# Altium PCB EEM_FMC_Carrier.PcbDoc (part 5 of 19)
Units mm, origin at the board's own origin, x right, y up, seen from the top; angles counter-clockwise.
Board outline 222.9 x 100 mm, 6 copper layers (TopLayer, MidLayer1, MidLayer2, SignalLayer1, Internal Plane 1, BottomLayer), stack 1.528 mm thick; 790 components, 743 nets, 3570 pads, 2277 vias.
Unrouted connection lines stored in the file: 3.
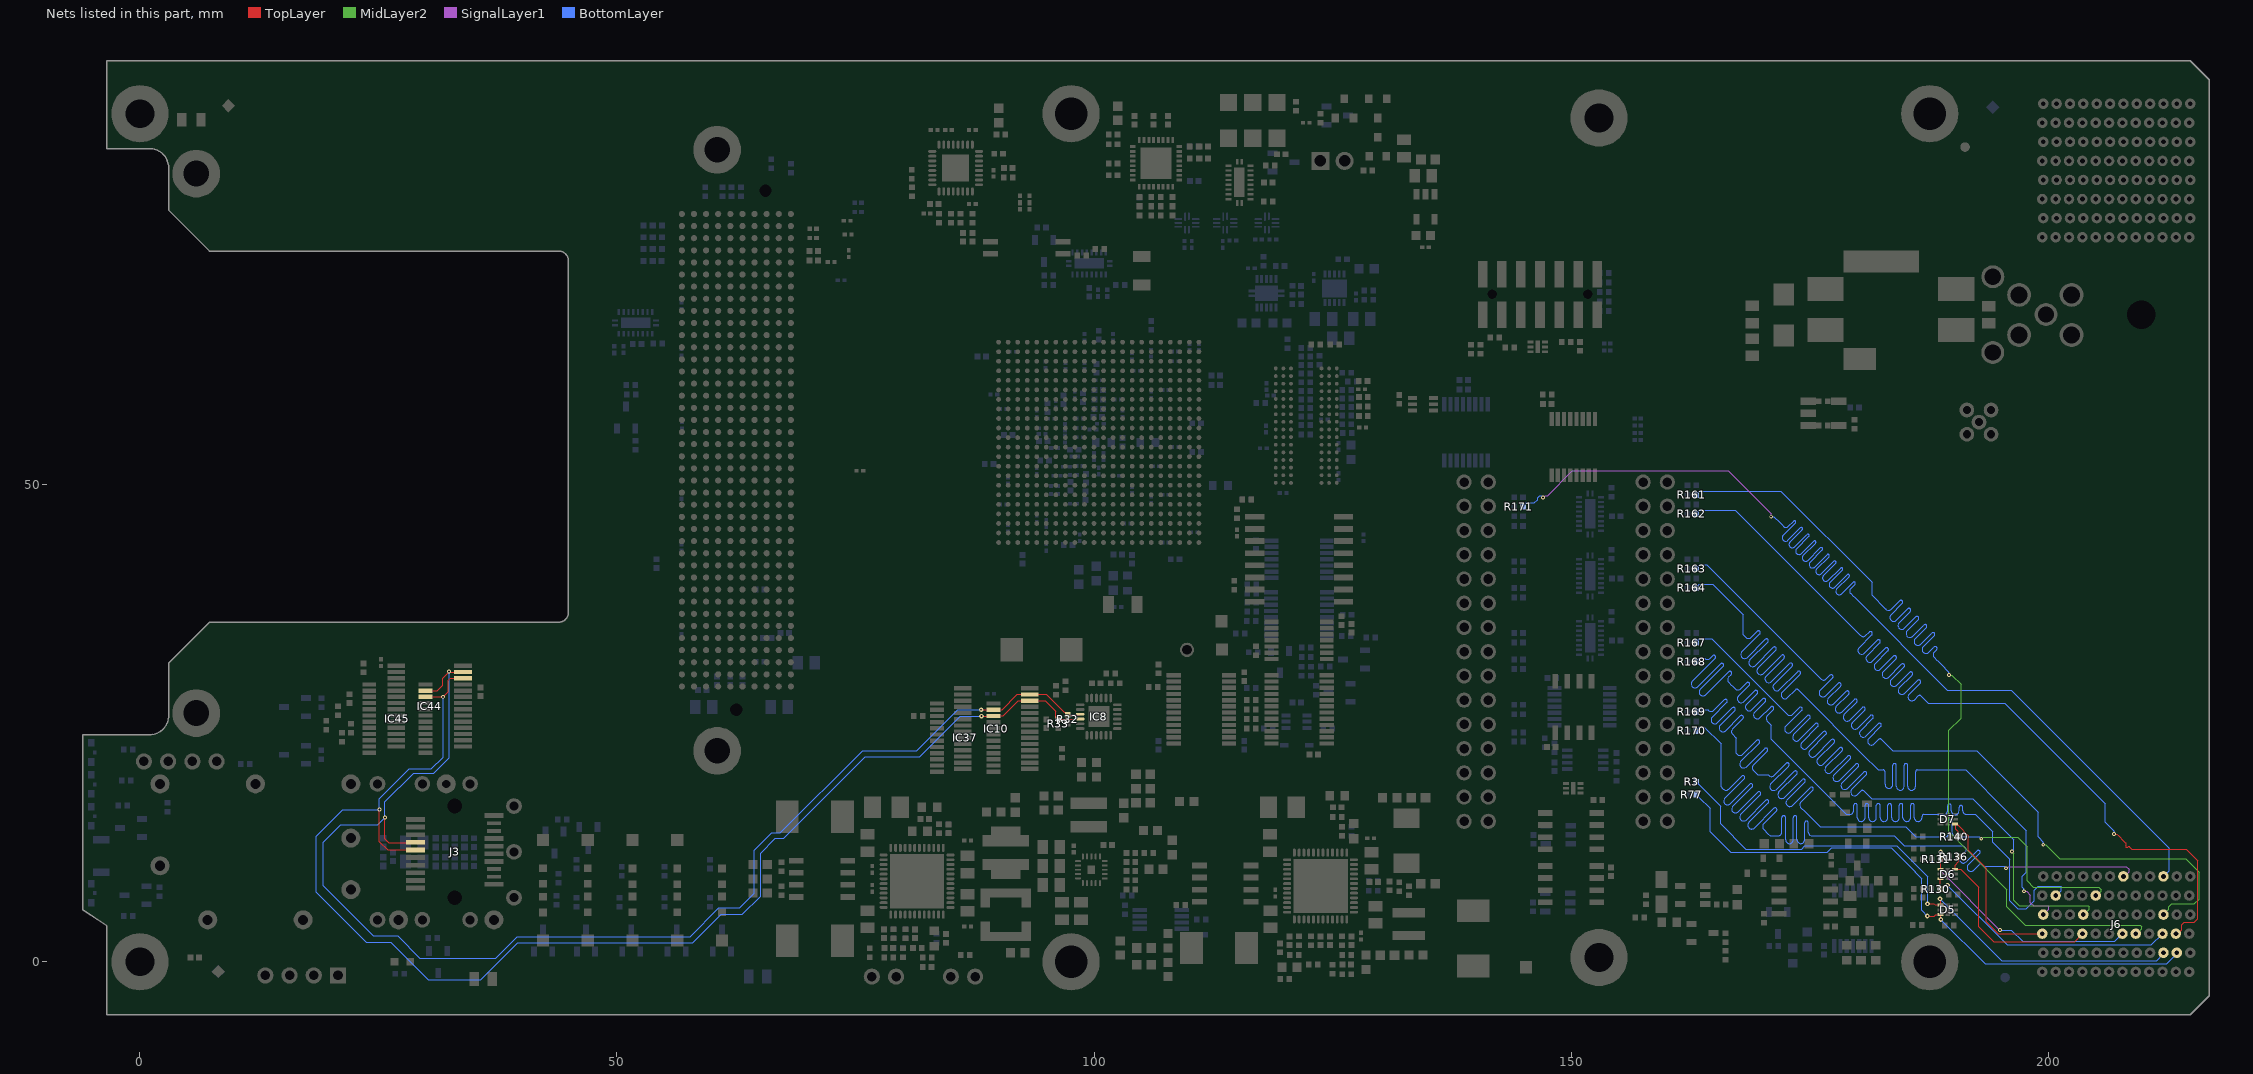
[diagram p8: the nets of this part, all layers, seen from the top]

## Part data (continued)
C231 C265: library part CTE3528-21_33UF_16V_10%, "Polarised capacitor", Case=B, Manufacturer=GENERIC, Manufacturer1 ComponentHeight=2.1mm, Manufacturer1 Example=AVX, Manufacturer1 Part Number=TAJB336K016R, Tolerance=±10%, Voltage=16V, Author="CERN DEM JLC", Component Type=Standard, CreateDate=03.12.2007, HelpURL=\\cern.ch\dfs\Applications\Altium\Datasheets\CTE_AVX_TAJ.pdf, LatestRevisionDate=03.12.2007, Manufacturer Part Number=CTE3528-21_33UF_16V_10%, Mounted=Yes, Part Description="Solid Tantalum Chip Capacitor", Part Number=CTE3528-21_33UF_16V_10%, Pin Count=2, Sense=No, SMD=Yes, Socket=No, Status=Preferred
C252 C256: library part CC0402_68PF_50V_5%_C0G, "Non-polarised capacitor", Case=0402, Manufacturer=GENERIC, Manufacturer1 ComponentHeight=0.55mm, Manufacturer1 Example=KEMET, Manufacturer1 Part Number=C0402C680J5GACTU, Tolerance=±5%, Voltage=50V, Author="CERN DEM JLC", Component Type=Standard, CreateDate=03.12.2007, HelpURL="\\cern.ch\dfs\Applications\Altium\Datasheets\CC0805_C0G_KEMET_(Commercial Grade).pdf", LatestRevisionDate=22.04.2015, Manufacturer Part Number=CC0402_68PF_50V_5%_C0G, Mounted=Yes, Part Description="SMD Multilayer Chip Ceramic Capacitor", Part Number=CC0402_68PF_50V_5%_C0G, Pin Count=2, Sense=No, SMD=Yes, Socket=No, Status=Preferred, TC=C0G/NP0
C254: library part CC0603_1.2NF_50V_10%_X7R, "Non-polarised capacitor", Case=0603, Manufacturer=GENERIC, Manufacturer1 ComponentHeight=0.87mm, Manufacturer1 Example=PHYCOMP, Manufacturer1 Part Number=223858615624, Tolerance=±10%, Voltage=50V, Author="CERN DEM JLC", Component Type=Standard, CreateDate=03.12.2007, HelpURL=\\cern.ch\dfs\Applications\Altium\Datasheets\CC0603_X7R_PHYCOMP.pdf, LatestRevisionDate=03.12.2007, Manufacturer Part Number=CC0603_1.2NF_50V_10%_X7R, Mounted=Yes, Part Description="SMD Multilayer Chip Ceramic Capacitor", Part Number=CC0603_1.2NF_50V_10%_X7R, Pin Count=2, Sense=No, SMD=Yes, Socket=No, Status=Preferred, TC=X7R
C261 C279: library part CC0402_82PF_25V_1%_C0G_KEMET_HiQ-CBR, "Non-polarised capacitor", Case=0402, Manufacturer=KEMET, Manufacturer Part Number=CBR04C820F3GAC, Tolerance=±1%, Voltage=25V, Author="CERN DEM MR", Component Type=Standard, ComponentHeight=0.55mm, CreateDate=2017-11-17, HelpURL=\\cern.ch\dfs\Applications\Altium\Datasheets\CC0402_C0G_KEMET_HiQ-CBR.pdf, LatestRevisionDate=2017-11-21, Mounted=Yes, Part Description="High Q and low ESR, SMD Multilayer Chip Ceramic Capacitor, HiQ-CBR Series", Part Number=CC0402_82PF_25V_1%_C0G_KEMET_HiQ-CBR, Pin Count=2, Sense=No, SMD=Yes, Socket=No, Status="Not Recommended", TC=C0G/NP0
C271 C281: library part CC0402_2.2NF_50V_10%_X7R, "Non-polarised capacitor", Case=0402, Manufacturer=GENERIC, Manufacturer1 ComponentHeight=0.55mm, Manufacturer1 Example=PHYCOMP, Manufacturer1 Part Number=223858715627, Tolerance=±10%, Voltage=50V, Author="CERN DEM JLC", Component Type=Standard, CreateDate=2007-12-03, HelpURL=\\cern.ch\dfs\Applications\Altium\Datasheets\CC0402_X7R_PHYCOMP.pdf, LatestRevisionDate=2007-12-03, Manufacturer Part Number=CC0402_2.2NF_50V_10%_X7R, Mounted=Yes, Part Description="SMD Multilayer Chip Ceramic Capacitor", Part Number=CC0402_2.2NF_50V_10%_X7R, Pin Count=2, Sense=No, SMD=Yes, Socket=No, Status="Not Recommended", TC=X7R
C277: library part CC0402_3.9NF_50V_5%_X7R, "Non-polarised capacitor", Case=0402, Manufacturer=GENERIC, Manufacturer1 ComponentHeight=0.55mm, Manufacturer1 Example="YAGEO PHYCOMP", Manufacturer1 Part Number=CC0402JRX7R9BB392, Tolerance=±5%, Voltage=50V, Author="CERN DEM BC", Component Type=Standard, CreateDate=2020-07-14, HelpURL=\\cern.ch\dfs\Applications\Altium\Datasheets\CC0402_X7R_YAGEO_6.3VTO50V.pdf, LatestRevisionDate=2020-07-14, Manufacturer Part Number=CC0402_3.9NF_50V_5%_X7R, Mounted=Yes, Part Description="SMD Multilayer Chip Ceramic Capacitor", Part Number=CC0402_3.9NF_50V_5%_X7R, Pin Count=2, Sense=No, SMD=Yes, Socket=No, Status=Preferred, TC=X7R
C283: library part CC0402_100PF_50V_5%_C0G, "Non-polarised capacitor", Case=0402, Manufacturer=GENERIC, Manufacturer1 ComponentHeight=0.55mm, Manufacturer1 Example=KEMET, Manufacturer1 Part Number=C0402C101J5GACTU, Tolerance=±5%, Voltage=50V, Author="CERN DEM JLC", Component Type=Standard, CreateDate=2007-12-03, HelpURL="\\cern.ch\dfs\Applications\Altium\Datasheets\CC0402_C0G_KEMET_(Commercial Grade).pdf", LatestRevisionDate=2015-04-22, Manufacturer Part Number=CC0402_100PF_50V_5%_C0G, Mounted=Yes, Part Description="SMD Multilayer Chip Ceramic Capacitor", Part Number=CC0402_100PF_50V_5%_C0G, Pin Count=2, Sense=No, SMD=Yes, Socket=No, Status=Preferred, TC=C0G/NP0
Cage1: library part TYCO_2007198-1, "SFP+ 1x1 Cage (20Pins)", Manufacturer="TYCO ELECTRONICS", Manufacturer Part Number=2007198-1, Author="CERN DEM JLC", Component Type=Standard, ComponentHeight=9.7mm, CreateDate=04-Jun-13, Family=SFP+, HelpURL=\\cern.ch\dfs\Applications\Altium\Datasheets\TYCO_2007198-1.pdf, LatestRevisionDate=12-Jun-13, Mounted=Yes, Part Description="1x1 Press Fit Cage For Use with SFP+ Connector (Small Form-factor Pluggable)", Part Number=TYCO_2007198-1, Pin Count=20, PressFit=Yes, Sense=No, SMD=No, Socket=No, Status=None
D1 D2: library part CMP-004-00040-1, "Rectifier Diode Small Signal Switching 70V 0.215A 3000ns 3-Pin SOT-23 T/R", Case/Package=SOT-23-3, Forward Current=715mA, Forward Voltage=1.25V, Max Operating Temperature=150°C, Max Surge Current=2A, Min Operating Temperature=-65°C, Pins=3
D3 D5 D6 D7 D8: library part CMP-004-00037-2, "Diode TVS Quint Common Anode Uni-Dir 3.3V 40W 6-Pin SLP EP T/R", Max Operating Temperature=125°C, Min Operating Temperature=-55°C, Mounting Technology="Surface Mount", Pins=6
D4: "Schottky Diode", Case=SOD323, Manufacturer=INFINEON, Power=750mA, Voltage=40V, Author="CERN DEM JLC", Bonding=No, Component Type=Standard, ComponentHeight=1.1mm, CreateDate=12.11.2014, Device=BAT165, HelpURL=\\cern.ch\dfs\Applications\Altium\Datasheets\BAT165.pdf, LatestRevisionDate=12.11.2014, Manufacturer Part Number=BAT165, Mounted=Yes, PackageDescription="Small Outline Diode (SOD-323), 1.70mm W X 1.25mm L X 1.10mm H body,  IPC Medium Density", Part Description="Medium Power AF Schottky Diode", Part Number=BAT165, Pin Count=2, PressFit=No, Sense=No, SMD=Yes, Socket=No
D10: "Zener Diode", Case=DO-214AA, Manufacturer="FAIRCHILD SEMICONDUCTOR", Power=600W, Voltage=12V, Author="CERN DEM JLC", Bonding=No, Component Type=Standard, ComponentHeight=2.65mm, CreateDate=10.04.2013, Device=SMBJ12A, HelpURL=\\cern.ch\dfs\Applications\Altium\Datasheets\SMBJ.pdf, LatestRevisionDate=10.04.2013, Manufacturer Part Number=SMBJ12A, Mounted=Yes, PackageDescription="DO-214-AA/SMB Diode, Molded Body; 5.34mm L X 3.625mm W X 2.65mm H, IPC Medium Density", Part Description="Uni-Directional Transient Voltage Suppressor Diode", Part Number=SMBJ12A, Pin Count=2, PressFit=No, Sense=No, SMD=Yes, Socket=No
D12 D13: "Schottky Diode", Case=SOD-523F, Manufacturer=COMCHIP, Power=500mA, Voltage=20V, Author="CERN DEM HF", Bonding=No, Component Type=Standard, ComponentHeight=1mm, CreateDate=13.10.2023, Device=CDBU0520-HF, HelpURL=\\cern.ch\dfs\Applications\Altium\Datasheets\CDBU0520-HF.pdf, LatestRevisionDate=13.10.2023, Manufacturer Part Number=CDBU0520-HF, Mounted=Yes, PackageDescription="Small Outline Diode Flat Lead (SOD-523F), Body; 1.80mm L X 1mm W X 0.85mm H", Part Description="20V Surface mount Schottky Barrier Diode", Part Number=CDBU0520-HF, Pin Count=2, PressFit=No, Sense=No, SMD=Yes, Socket=No
FL1: library part FIL_MURATA_BNX022-01L, "Block Type EMIFIL (LC Combined)", Manufacturer=MURATA, Manufacturer Part Number=BNX022-01L, Resistance=0.5R, Author="CERN DEM JLC", Component Type=Standard, ComponentHeight=3.3mm, CreateDate=10.10.2012, HelpURL=\\cern.ch\dfs\Applications\Altium\Datasheets\FIL_MURATA_BNX022-01L.pdf, LatestRevisionDate=10.10.2012, Mounted=Yes, Part Description="Block Type EMIFIL (LC Combined) SMD Type, BNX02* Series", Part Number=FIL_MURATA_BNX022-01L, Pin Count=2, Sense=No, SMD=Yes, Socket=No, Status=None
FTG1 FTG6: library part FIDUCIAL_TARGET_C100-200, "Fiducial Target", Author="CERN DEM JLC", Component Type="Standard (No BOM)", ComponentHeight=0mm, CreateDate=09.02.2010, Family=Fiducial, HelpURL=Undefined, LatestRevisionDate=04.04.2012, Mounted=No, PackageDescription="Round Fiducial Target, Top Layer, 1.0mm, Top Solder 2.0mm, Keepout =2.0mm", Part Description="Round Fiducial Target, Top Layer, 1.0mm, Top Solder 2.0mm, Keepout =2.0mm", Part Number=FIDUCIAL_TARGET_C100-200, Pin Count=1, Sense=No, SMD=Yes, Socket=No, Status=None
FTG2 FTG3 FTG4 FTG5: library part FIDUCIAL_TARGET_S100-200, "Fiducial Target", Author="CERN DEM JLC", Component Type="Standard (No BOM)", ComponentHeight=0mm, CreateDate=09.02.2010, Family=Fiducial, HelpURL=Undefined, LatestRevisionDate=04.04.2012, Mounted=No, PackageDescription="Square Fiducial Target, Top Layer, 1.0mm, Top Solder 2.0mm, Keepout =2.0mm", Part Description="Square Fiducial Target, Top Layer, 1.0mm, Top Solder 2.0mm, Keepout =2.0mm", Part Number=FIDUCIAL_TARGET_S100-200, Pin Count=1, Sense=No, SMD=Yes, Socket=No, Status=None
HS1: "Heat Sink Without Pad", Manufacturer="Radian Thermal Products, Inc.", Manufacturer Part Number=FI23+BU+T725, ComponentHeight="16 mm", HelpURL=https://www.radianheatsinks.com/product/fi23/, Part Description="23 x 23 x 16 mm, clip on heatsink with fan for IC design BGA and others"
IC1: "Two Selectable Inputs, 8 LVPECL Outputs, SiGe Clock Fanout Buffer", Case=QFN32, Manufacturer="ANALOG DEVICES", Author="CERN DEM MR", Bonding=No, Component Type=Standard, ComponentHeight=0.8mm, CreateDate=2016-11-30, Device=ADCLK948BCPZ, HelpURL=\\cern.ch\dfs\Applications\Altium\Datasheets\ADCLK948BCPZ.pdf, LatestRevisionDate=2016-11-30, Manufacturer Part Number=ADCLK948BCPZ, Mounted=Yes, PackageDescription="QFN, 0.50mm Pitch, Square; 32 Pin, 5.00mm L X 5.00mm W X 0.80mm H body (w/Thermal Tab 2.85 X 2.85mm), IPC Medium Density", Part Description="Two Selectable Inputs, 8 LVPECL Outputs, SiGe Clock Fanout Buffer", Part Number=ADCLK948BCPZ, Pin Count=33, PressFit=No, Sense=No, SMD=Yes, Socket=No
IC2: "ULTRA PRECISION DIFFERENTIAL LVPECL 4:1 MUX with 1:2 FANOUT and INTERNAL TERMINATION", Manufacturer=Microchip, Device=SY58029U, Manufacturer Part Number=SY58029U
IC3 IC27 IC28 IC29 IC36 IC41: "Two-Channel Differential 2:1/1:2 USB3.1 Mux/Demux", Case=TQFN20, Manufacturer="TEXAS INSTRUMENTS", Author="CERN DEM BC", Bonding=No, Component Type=Standard, ComponentHeight=1mm, CreateDate=2019-11-06, Device=HD3SS3212RKS, HelpURL=\\cern.ch\dfs\Applications\Altium\Datasheets\HD3SS3212RKS.pdf, LatestRevisionDate=2019-11-06, Manufacturer Part Number=HD3SS3212RKS, Mounted=Yes, PackageDescription="QFN, TEXAS Case Style RKS, 0.50mm Pitch, Rect.; 20 Pin, 2.50mm L X 4.50mm W X 1.00mm H body (w/Thermal Tab 1.1mm X 3.1mm)", Part Description="Two-Channel Differential 2:1/1:2 USB3.1 Mux/Demux", Part Number=HD3SS3212RKS, Pin Count=21, PressFit=No, Sense=No, SMD=Yes, Socket=No
IC4: "Artix-7 FPGA, 285 User I/Os, 4 GTP, 484-Ball BGA, Pb-Free", Device=XC7A200T-3FBG484E, Manufacturer Part Number=XC7A200T-3FBG484E
IC5 IC6 IC7: "Dual-Bit Dual-Supply Bus Transceiver With Configurable Voltage Translation and 3-State Outputs", Case=QFN10, Manufacturer="TEXAS INSTRUMENTS", Author="CERN DEM JLC", Bonding=No, Component Type=Standard, ComponentHeight=0.55mm, CreateDate=07.07.2014, Device=SN74AVC2T245RSWR, HelpURL=\\cern.ch\dfs\Applications\Altium\Datasheets\SN74AVC2T245RSWR.pdf, LatestRevisionDate=30.03.2017, Manufacturer Part Number=SN74AVC2T245RSWR, Mounted=Yes, PackageDescription="QFN, 0.40mm Pitch, Rect.;10 Pin, 1.80mm L X 1.40mm W X 0.55mm H Body, IPC Medium Density", Part Description="Dual-Bit Dual-Supply Bus Transceiver With Configurable Voltage Translation and 3-State Outputs", Part Number=SN74AVC2T245RSWR, Pin Count=10, PressFit=No, Sense=No, SMD=Yes, Socket=No, Status="Not Recommended"
IC8: "Low Voltage 8-Channel I2C Switch With Reset", Case=QFN24, Manufacturer="TEXAS INSTRUMENTS", Author="CERN DEM JLC", Bonding=No, Component Type=Standard, ComponentHeight=1mm, CreateDate=2014-07-07, Device=TCA9548ARGER, HelpURL=\\cern.ch\dfs\Applications\Altium\Datasheets\TCA9548ARGER.pdf, LatestRevisionDate=2014-07-07, Manufacturer Part Number=TCA9548ARGER, Mounted=Yes, PackageDescription="QFN, 0.50mm Pitch, Square; 24 Pin, 4.00mm L X 4.00mm W X 1.00mm H body (w/Thermal Tab 2.20 X 2.20mm), IPC Medium Density", Part Description="Low Voltage 8-Channel I2C Switch With Reset", Part Number=TCA9548ARGER, Pin Count=25, PressFit=No, Sense=No, SMD=Yes, Socket=No
IC9 IC15 IC17: "8-Bit Dual-Supply Bus Transceiver With Configurable Voltage Translation and 3-State Outputs", Case=TSSOP24, Manufacturer="TEXAS INSTRUMENTS", Author="CERN DEM JLC", Bonding=No, Component Type=Standard, ComponentHeight=1.2mm, CreateDate=02.09.2009, Device=SN74LVC8T245PW, HelpURL=\\cern.ch\dfs\Applications\Altium\Datasheets\SN74LVC8T245PW.pdf, LatestRevisionDate=02.09.2009, Manufacturer Part Number=SN74LVC8T245PW, Mounted=Yes, PackageDescription="SOP, 0.65mm Pitch; 24 Pin, 4.40mm W X 7.80mm L X 1.20mm H Body, IPC Medium Density", Part Description="8-Bit Dual-Supply Bus Transceiver With Configurable Voltage Translation and 3-State Outputs", Part Number=SN74LVC8T245PW, Pin Count=24, PressFit=No, Sense=No, SMD=Yes, Socket=No
IC10 IC44: "16-bit I/O Port Expander With Serial Interface", Case=SSOP28, Manufacturer="MICROCHIP TECHNOLOGY", Author="CERN DEM JLC", Bonding=No, Component Type=Standard, ComponentHeight=2mm, CreateDate=17.01.2011, Device=MCP23017-E/SS, HelpURL=\\cern.ch\dfs\Applications\Altium\Datasheets\MCP23017-E-SS.pdf, LatestRevisionDate=17.01.2011, Manufacturer Part Number=MCP23017-E/SS, Mounted=Yes, PackageDescription="SOP, 0.65mm Pitch; 28 Pin, 5.30mm W X 10.20mm L X 2.00mm H Body, IPC Medium Density", Part Description="16-bit I/O Port Expander With Serial Interface", Part Number=MCP23017-E/SS, Pin Count=28, PressFit=No, Sense=No, SMD=Yes, Socket=No
IC11: "32 Meg x 16 x 8 Banks DDR3L SDRAM", Case=BGA96, Manufacturer="MICRON TECHNOLOGY", Author="CERN DEM MR", Bonding=No, Component Type=Standard, ComponentHeight=1.2mm, CreateDate=2015-12-14, Device=MT41K256M16TW-107:P, HelpURL=\\cern.ch\dfs\Applications\Altium\Datasheets\MT41K256M16TW-107-P.pdf, LatestRevisionDate=2015-12-14, Manufacturer Part Number=MT41K256M16TW-107:P, Mounted=Yes, PackageDescription="BGA 0.8mm, Pitch, Square 96 Pin, 9 Columns x 16 Rows, Body 14mm X 8mm X 1.2mm H", Part Description="+1.5V, 4Gb (32Meg x 16 x 8 banks) DDR3L SDRAM", Part Number=MT41K256M16TW-107:P, Pin Count=96, PressFit=No, Sense=No, SMD=Yes, Socket=No
IC12: "Sink/Source DDR Termination Regulator", Case=SON10, Manufacturer="TEXAS INSTRUMENTS", Author="CERN DEM JLC", Bonding=No, Component Type=Standard, ComponentHeight=1mm, CreateDate=03.02.2010, Device=TPS51200DRCT, HelpURL=\\cern.ch\dfs\Applications\Altium\Datasheets\TPS51200DRCT.pdf, LatestRevisionDate=06.11.2013, Manufacturer Part Number=TPS51200DRCT, Mounted=Yes, PackageDescription="SON, 0.50mm Pitch, 10-pin, 3.00mm W  X 3.00mm L X 1.00mm Height, (w/thermal tab 1.75 X 2.50 mm)", Part Description="3.3V Sink/Source DDR Termination Regulator", Part Number=TPS51200DRCT, Pin Count=11, PressFit=No, Sense=No, SMD=Yes, Socket=No
IC13: "Integrated Circuit", Manufacturer_Name=onsemi, Mouser Part Number=863-NCP51200MNTXG, Arrow Part Number=NCP51200MNTXG, Arrow Price/Stock=https://www.arrow.com/en/products/ncp51200mntxg/on-semiconductor?region=nac, Datasheet Link=http://www.onsemi.com/pub/Collateral/NCP51200-D.PDF, Height=1mm, Manufacturer Part Number=NCP51200MNTXG, Mouser Price/Stock=https://www.mouser.co.uk/ProductDetail/onsemi/NCP51200MNTXG?qs=mt7EBqA2jzgnxcGILBvARw%3D%3D
IC14: "500mA Peak Output LDO Regulator", Case=SOT23-5, Manufacturer="MICROCHIP TECHNOLOGY", Author="CERN DEM WB", Bonding=No, Component Type=Standard, ComponentHeight=1.45mm, CreateDate=2019-04-16, Device=MIC5219-3.3YM5, HelpURL=\\cern.ch\dfs\Applications\Altium\Datasheets\MIC5219-3.3YM5.pdf, LatestRevisionDate=2019-04-16, Manufacturer Part Number=MIC5219-3.3YM5, Mounted=Yes, PackageDescription="SOT, 0.95mm pitch; 5 pin, 1.60mm W X 2.90mm L X 1.45mm H body, IPC Medium Density", Part Description="3.3V 500mA Peak Output Low Drop-Out  (LDO) Regulator", Part Number=MIC5219-3.3YM5, Pin Count=5, PressFit=No, Sense=No, SMD=Yes, Socket=No
IC16: "4-BIT 1-OF-2 FET Multiplexer/Demultiplexer 2.5V/3.3V Low-Voltage Bus Switch 5V Tolerant Shifter", Case=TSSOP16, Manufacturer="TEXAS INSTRUMENTS", Author="CERN DEM JLC", Bonding=No, Component Type=Standard, ComponentHeight=1.2mm, CreateDate=2012-01-30, Device=SN74CB3T3257PW, HelpURL=\\cern.ch\dfs\Applications\Altium\Datasheets\SN74CB3T3257PW.pdf, LatestRevisionDate=2012-01-30, Manufacturer Part Number=SN74CB3T3257PW, Mounted=Yes, PackageDescription="SOP, 0.65mm Pitch; 16 Pin, 4.40mm W X 5.00mm L X 1.20mm H body, IPC Medium Density", Part Description="4-Bit 1-of-2 FET Multiplexer/Demultiplexer 2.5V/3.3V Low-Voltage Bus Switch 5V Tolerant Shifter", Part Number=SN74CB3T3257PW, Pin Count=16, PressFit=No, Sense=No, SMD=Yes, Socket=No
IC18 IC19: "TinyLogic® UHS 2-Input Non-Inverting Multiplexer", Case=SOT363, Manufacturer="FAIRCHILD SEMICONDUCTOR", Author="CERN DEM JLC", Bonding=No, Component Type=Standard, ComponentHeight=1.1mm, CreateDate=22.03.2012, Device=NC7SZ157P6X, HelpURL=\\cern.ch\dfs\Applications\Altium\Datasheets\NC7SZ157P6X.pdf, LatestRevisionDate=22.03.2012, Manufacturer Part Number=NC7SZ157P6X, Mounted=Yes, PackageDescription="SOT363, 0.65mm pitch; 6 pin, 1.40mm W X 2.15mm L, IPC Medium Density", Part Description="TinyLogic® UHS 2-Input Non-Inverting Multiplexer", Part Number=NC7SZ157P6X, Pin Count=6, PressFit=No, Sense=No, SMD=Yes, Socket=No
IC20 IC21 IC38 IC40: library part CMP-016-00739-2, "12-V, 1: 1 (SPST), (SPST), 4-channel analog switch 14-TSSOP -55 to 125", Case/Package=TSSOP, Max Operating Temperature=125°C, Max Supply Voltage=10V, Min Operating Temperature=-55°C, Min Supply Voltage=2V, Mounting Technology="Surface Mount", Pins=14
IC22: "128Mbit, MirrorBit® Flash Non-Volatile Memory CMOS 3.0 Volt Core with Versatile I/O Serial Peripheral Interface with Multi-I/O", Case=SOIC16, Manufacturer=SPANSION, Author="CERN DEM JLC", Bonding=No, Component Type=Standard, ComponentHeight=2.65mm, CreateDate=2014-07-10, Device=S25FL128SAGMFIR01, HelpURL=\\cern.ch\dfs\Applications\Altium\Datasheets\S25FL128SAGMFIR01.pdf, LatestRevisionDate=2014-07-10, Manufacturer Part Number=S25FL128SAGMFIR01, Mounted=Yes, PackageDescription="SOIC 16, Pitch 1.27mm - Body 7.5x10.3mm, IPC Medium Density", Part Description="128Mbit, 133MHz, MirrorBit® Flash Non-Volatile Memory CMOS 3V Core with Versatile I/O Serial Peripheral Interface with Multi-I/O", Part Number=S25FL128SAGMFIR01, Pin Count=11, PressFit=No, Sense=No, SMD=Yes, Socket=No
IC23: "Dual Bidirectional I2C Bus And SMBus Voltage-Level Translator", Case=SSOP8, Manufacturer="TEXAS INSTRUMENTS", Author="CERN DEM JLC", Bonding=No, Component Type=Standard, ComponentHeight=1.3mm, CreateDate=25.02.2013, Device=PCA9306DCTR, HelpURL=\\cern.ch\dfs\Applications\Altium\Datasheets\PCA9306DCTR.pdf, LatestRevisionDate=11.02.2016, Manufacturer Part Number=PCA9306DCTR, Mounted=Yes, PackageDescription="SOP, 0.65mm, Pitch; 8 Pin, 2.80mm W X 2.95mm L X 1.30mm H Body, PC Medium Density", Part Description="Dual Bidirectional I2C Bus And SMBus Voltage-Level Translator", Part Number=PCA9306DCTR, Pin Count=8, PressFit=No, Sense=No, SMD=Yes, Socket=No
IC24: library part CMP-031-05512-1, "Integrated Circuit", Manufacturer Name=NXP, Mouser Part Number=771-SC18IS606PWJ, Arrow Part Number=SC18IS606PWJ, Arrow Price/Stock=https://www.arrow.com/en/products/sc18is606pwj/nxp-semiconductors?region=nac, Datasheet Link=https://www.nxp.com/docs/en/data-sheet/SC18IS606.pdf, Design Item ID=SC18IS606PWJ, Height=1.1mm, Manufacturer Part Number=SC18IS606PWJ, Mouser Price/Stock=https://www.mouser.co.uk/ProductDetail/NXP-Semiconductors/SC18IS606PWJ?qs=pBJMDPsKWf02qtdqbj2bbA%3D%3D, Source=SamacSys.SchLib
IC25 IC26: "1.7V-5.5V, 2K I2C™ Serial EEPROMs with EUI-48™ Node Identity", Case=SOIC8, Manufacturer="MICROCHIP TECHNOLOGY", Author="CERN DEM MR", Bonding=No, Component Type=Standard, ComponentHeight=1.75mm, CreateDate=19.07.2016, Device=24AA025E48-I/SN, HelpURL=\\cern.ch\dfs\Applications\Altium\Datasheets\24AA025E48-I-SN.pdf, LatestRevisionDate=19.07.2016, Manufacturer Part Number=24AA025E48-I/SN, Mounted=Yes, PackageDescription="SOIC 8, Pitch 1.27mm - Body 4x5mm, IPC Medium Density", Part Description="1.7V-5.5V, 2K I2C™ Serial EEPROMs with EUI-48™ Node Identity", Part Number=24AA025E48-I/SN, Pin Count=8, PressFit=No, Sense=No, SMD=Yes, Socket=No
IC30: "Quad LVDS Line Receivers with Integrated Termination and Flow-Through Pinout", Case=TSSOP16, Manufacturer=MAXIM, Author="CERN DEM MR", Bonding=No, Component Type=Standard, ComponentHeight=1.1mm, CreateDate=2015-12-14, Device=MAX9122EUE+, HelpURL=\\cern.ch\dfs\Applications\Altium\Datasheets\MAX9122EUE+.pdf, LatestRevisionDate=2015-12-14, Manufacturer Part Number=MAX9122EUE+, Mounted=Yes, PackageDescription="SOP, 0.65mm Pitch; 16 Pin, 4.40mm W X 5.00mm L X 1.10mm H body, IPC Medium Density", Part Description="Quad LVDS Line Receivers with Integrated Termination and Flow-Through Pinout", Part Number=MAX9122EUE+, Pin Count=16, PressFit=No, Sense=No, SMD=Yes, Socket=No
IC31: "Single, 3V, CMOS, LVDS, High Speed Differential Driver", Case=SOIC8, Manufacturer="ANALOG DEVICES", Author="CERN DEM JMW", Bonding=No, Component Type=Standard, ComponentHeight=1.75mm, CreateDate=2014-02-26, Device=ADN4661BRZ, HelpURL=\\cern.ch\dfs\Applications\Altium\Datasheets\ADN4661BRZ.pdf, LatestRevisionDate=2014-02-26, Manufacturer Part Number=ADN4661BRZ, Mounted=Yes, PackageDescription="SOIC 8, Pitch 1.27mm - Body 4x5mm, IPC Medium Density", Part Description="Single, 3V, CMOS, LVDS, High Speed Differential Driver", Part Number=ADN4661BRZ, Pin Count=8, PressFit=No, Sense=No, SMD=Yes, Socket=No
IC32 IC34: "5-Channel Integrated Power Solution with Quad buck Regulators and 200mA LDO Regulator", Case=QFN48, Manufacturer="ANALOG DEVICES", Author="CERN DEM BC", Bonding=No, Component Type=Standard, ComponentHeight=0.8mm, CreateDate=2015-07-30, Device=ADP5052ACPZ, HelpURL=\\cern.ch\dfs\Applications\Altium\Datasheets\ADP5052ACPZ.pdf, LatestRevisionDate=2015-07-30, Manufacturer Part Number=ADP5052ACPZ, Mounted=Yes, PackageDescription="QFN, 0.50mm pitch,square; 12 pin X 12 pin, 7mm X 7mm X 0.8mm H body (w/thermal tab 5.70 X 5.70mm),  IPC Medium Density", Part Description="5-Channel Integrated Power Solution with Quad buck Regulators and 200mA LDO Regulator", Part Number=ADP5052ACPZ, Pin Count=49, PressFit=No, Sense=No, SMD=Yes, Socket=No
IC33: "Digital Temperature Sensor and Thermal Watchdog with Two-Wire Interface", Case=SSOP8, Manufacturer="TEXAS INSTRUMENTS", Author="CERN DEM JLC", Bonding=No, Component Type=Standard, ComponentHeight=1.09mm, CreateDate=15.10.2012, Device=LM75AIMM/NOPB, HelpURL=\\cern.ch\dfs\Applications\Altium\Datasheets\LM75AIMM-NOPB.pdf, LatestRevisionDate=15.10.2012, Manufacturer Part Number=LM75AIMM/NOPB, Mounted=Yes, PackageDescription="SOP, 0.65mm pitch; 8 pin,3.00mm W X 3.00mm L X 1.09mm H bodyI, PC Medium Density", Part Description="-25° to +100°C ±2°C Digital Temperature Sensor and Thermal Watchdog with Two-Wire Interface", Part Number=LM75AIMM/NOPB, Pin Count=8, PressFit=No, Sense=No, SMD=Yes, Socket=No
IC35: "500mA-Peak Output LDO Regulator 5.0V", Manufacturer=Microchip, Device=MIC5219-5.0YM5, Manufacturer Part Number=MIC5219-5.0YM5
IC37 IC45: "Low-Voltage 16-Bit I2C-Bus I/O Port with Interrupt and Reset", Case=TSSOP24, Manufacturer="NXP SEMICONDUCTORS", Author="CERN DEM JMW", Bonding=No, Component Type=Standard, ComponentHeight=1.1mm, CreateDate=2020-08-06, Device=PCA9539APW, HelpURL=\\cern.ch\dfs\Applications\Altium\Datasheets\PCA9539APW.pdf, LatestRevisionDate=2020-08-06, Manufacturer Part Number=PCA9539APW, Mounted=Yes, PackageDescription="SOP, 0.65mm Pitch; 24 Pin, 4.40mm W X 7.80mm L X 1.10mm H body, IPC Medium Density", Part Description="Low-Voltage 16-Bit I2C-Bus I/O Port with Interrupt and Reset", Part Number=PCA9539APW, Pin Count=24, PressFit=No, Sense=No, SMD=Yes, Socket=No
IC39: "LinCMOS Timer", Case=SOIC8, Manufacturer="TEXAS INSTRUMENTS", Author="CERN DEM JMW", Bonding=No, Component Type=Standard, ComponentHeight=1.75mm, CreateDate=23.08.2016, Device=TLC555ID, HelpURL=\\cern.ch\dfs\Applications\Altium\Datasheets\TLC555ID.pdf, LatestRevisionDate=23.08.2016, Manufacturer Part Number=TLC555ID, Mounted=Yes, PackageDescription="SOIC 8, Pitch 1.27mm, Body 4x5mm, IPC Medium Density", Part Description="LinCMOS Timer", Part Number=TLC555ID, Pin Count=8, PressFit=No, Sense=No, SMD=Yes, Socket=No
IC42 IC43: "1.7V-5.5V, 2K I2C Serial EEPROM With EUI-48 Node Identity", Case=SOT23-5, Manufacturer="MICROCHIP TECHNOLOGY", Author="CERN DEM MR", Bonding=No, Component Type=Standard, ComponentHeight=1.45mm, CreateDate=31.03.2016, Device=24AA02E48T-I/OT, HelpURL=\\cern.ch\dfs\Applications\Altium\Datasheets\24AA02E48T-I-OT.pdf, LatestRevisionDate=31.03.2016, Manufacturer Part Number=24AA02E48T-I/OT, Mounted=Yes, PackageDescription="SOT, 0.95mm pitch; 5 pin, 1.60mm W X 2.90mm L X 1.45mm H body, IPC Medium Density", Part Description="1.7V-5.5V, 2K I2C Serial EEPROM with EUI-48 Node Identity", Part Number=24AA02E48T-I/OT, Pin Count=5, PressFit=No, Sense=No, SMD=Yes, Socket=No
IC46: "Switching Voltage Regulators 4.5-V to 24-V, 8-A synchronous step-down voltage regulator 20-VQFN-HR -40 to 125", Manufacturer_Name="Texas Instruments", Mouser Part Number=595-TPS51396ARJET, Datasheet Link=https://www.ti.com/lit/ds/symlink/tps51396a.pdf?ts=1646990548921&ref_url=https%253A%252F%252Fwww.ti.com%252Fproduct%252FTPS51396A, Geometry.Height=1mm, Manufacturer_Part_Number=TPS51396ARJET, Mouser Price/Stock=https://www.mouser.co.uk/ProductDetail/Texas-Instruments/TPS51396ARJET?qs=QNEnbhJQKvZLa4XIH83fyw%3D%3D
J1: library part MOLEX_22-27-2021, "Connector 2 Male", Manufacturer=MOLEX, Manufacturer Part Number=22-27-2021, Author="CERN DEM JLC", Component Type=Standard, ComponentHeight=11.7mm, CreateDate=04.12.2008, Family=KK®, HelpURL=\\cern.ch\dfs\Applications\Altium\Datasheets\MOLEX_22-27-2021.pdf, LatestRevisionDate=04.12.2008, Mounted=Yes, Part Description="2.54mm (.100\") Pitch KK® Wire-to-Board Header, Vertical, with Friction Lock, 2 Circuits, Tin (Sn) Plating", Part Number=MOLEX_22-27-2021, Pin Count=2, PressFit=No, Sense=No, SMD=No, Socket=No, Status=None
J2: library part MOLEX_87832-1420, "Connector 14 Male", Manufacturer=MOLEX, Manufacturer Part Number=87832-1420, Author="CERN DEM JLC", Component Type=Standard, ComponentHeight=7.6mm, CreateDate=09.09.2008, Family=Milli-Grid™, HelpURL=\\cern.ch\dfs\Applications\Altium\Datasheets\MOLEX_87832-1420.pdf, LatestRevisionDate=09.09.2008, Mounted=Yes, Part Description="2.00mm (.079\") Pitch Milli-Grid™ Header, Surface Mount, Vertical, Shrouded, 14 Circuits,with Locking Windows and Centre Polarization Slot, PCB Locator", Part Number=MOLEX_87832-1420, Pin Count=14, PressFit=No, Sense=No, SMD=Yes, Socket=No, Status=None
J3: library part TYCO_1888247-1, "20 Position SFP+ Connector (Small Form-factor Pluggable)", Manufacturer="TYCO ELECTRONICS", Manufacturer Part Number=1888247-1, Author="CERN DEM JLC", Component Type=Standard, ComponentHeight=5.4mm, CreateDate=27-Feb-12, Family=SFP+, HelpURL=\\cern.ch\dfs\Applications\Altium\Datasheets\TYCO_1888247-1.pdf, LatestRevisionDate=27-Feb-12, Mounted=Yes, Part Description="20 Position, Pitch 0.8mm SFP+ Receptacle (Small Form-factor Pluggable)", Part Number=TYCO_1888247-1, Pin Count=20, PressFit=No, Sense=No, SMD=Yes, Socket=No, Status=None
J4: library part SAMTEC_MMCX-J-P-H-ST-TH1, Manufacturer=SAMTEC, Manufacturer Part Number=MMCX-J-P-H-ST-TH1, Author="CERN DEM JLC", Component Type=Standard, ComponentHeight=4.35mm, CreateDate=05.12.2012, HelpURL=\\cern.ch\dfs\Applications\Altium\Datasheets\SAMTEC_MMCX-J-P-H-ST-TH1.pdf, LatestRevisionDate=05.12.2012, Mounted=Yes, Part Description="Straight Through-hole 50 Ohm Micro Mini RF Jack, MMCX Series", Part Number=SAMTEC_MMCX-J-P-H-ST-TH1, Pin Count=2, PressFit=No, Sense=No, SMD=No, Socket=No, Status=None
J5: library part SAMTEC_ASP-134486-01, "Connector VITA 57, 400 Female contacts in 10 row abcdefghj", Manufacturer=SAMTEC, Manufacturer Part Number=ASP-134486-01, Author="CERN DEM JLC", Component Type=Standard, ComponentHeight=6.55mm, CreateDate=30-Apr-09, Family="VITA 57", HelpURL=\\cern.ch\dfs\Applications\Altium\Datasheets\SAMTEC_ASP-134486-01.pdf, LatestRevisionDate=17-Aug-09, Mounted=Yes, Part Description="400 contacts (10 rows abcdefghj) Surface Mount Female Connector, VITA 57 (CC-HPC-10)", Part Number=SAMTEC_ASP-134486-01, Pin Count=400, PressFit=No, Sense=No, SMD=Yes, Socket=No, Status=None
J6: library part AMPHENOL_10052825-101LF, "72 Contacts Header, 6 Columns, 4 Pairs per Column", Manufacturer=AMPHENOL, Manufacturer Part Number=10052825-101LF, Author="CERN DEM MR", ClassName=Overlapping, Component Type=Standard, ComponentHeight=15.35mm, ComponentLink1Description=Application, ComponentLink1URL=\\cern.ch\dfs\Applications\Altium\Datasheets\AMPHENOL_10052825-101LF_Application.pdf, CreateDate=19/02/2018, Family="AirMax VS", HelpURL=\\cern.ch\dfs\Applications\Altium\Datasheets\AMPHENOL_10052825-101LF.pdf, LatestRevisionDate=19/02/2018, Mounted=Yes, Part Description="72 Contacts, 2mm Pitch, 6 Columns, 4 Pairs per Column, 4 Walls, Right Angle Header", Part Number=AMPHENOL_10052825-101LF, Pin Count=72, PressFit=Yes, Sense=No, SMD=No, Socket=No, Status=None
J7: library part AMPHENOL_10052838-101LF, "96 Contacts Header, 8 Columns, 4 Pairs per Column", Manufacturer=AMPHENOL, Manufacturer Part Number=10052838-101LF, Author="CERN DEM MR", Component Type=Standard, ComponentHeight=15.35mm, ComponentLink1Description=Application, ComponentLink1URL=\\cern.ch\dfs\Applications\Altium\Datasheets\AMPHENOL_10052838-101LF_Application.pdf, CreateDate=19.02.2018, Family="AirMax VS", HelpURL=\\cern.ch\dfs\Applications\Altium\Datasheets\AMPHENOL_10052838-101LF.pdf, LatestRevisionDate=19.02.2018, Mounted=Yes, Part Description="96 Contacts, 2mm Pitch, 8 Columns, 4 Pairs per Column, 4 Walls, Right Angle Header", Part Number=AMPHENOL_10052838-101LF, Pin Count=96, PressFit=Yes, Sense=No, SMD=No, Socket=No, Status=None
J8 J9: library part 3M_N2530-6002RB, "Connector 30 Male", Manufacturer=3M, Manufacturer Part Number=N2530-6002RB, Author="CERN DEM JLC", Component Type=Standard, ComponentHeight=10.03mm, CreateDate=11.02.2009, Family="Header 30", HelpURL=\\cern.ch\dfs\Applications\Altium\Datasheets\3M_N2530-6002RB.pdf, LatestRevisionDate=11.08.2009, Mounted=Yes, Part Description="30 Contacts - Straight .100'' x .100'' Low Profile Four-Wall Header, 2500 Series", Part Number=3M_N2530-6002RB, Pin Count=30, PressFit=No, Sense=No, SMD=No, Socket=No, Status=None
J10: library part MOLEX_39-30-0040, "Connector 4 Male", Manufacturer=MOLEX, Manufacturer Part Number=39-30-0040, Author="CERN DEM JLC", Component Type=Standard, ComponentHeight=11.4mm, CreateDate=2018-10-02, Family="Mini-Fit Jr.™", HelpURL=\\cern.ch\dfs\Applications\Altium\Datasheets\MOLEX_39-30-0040.pdf, LatestRevisionDate=2018-10-02, Mounted=Yes, Part Description="4.20mm (.165\") Pitch Mini-Fit Jr. Header, Dual Row, Right Angle with Snap-in Plastic Peg PCB Lock, 4 Circuits", Part Number=MOLEX_39-30-0040, Pin Count=4, PressFit=No, Sense=No, SMD=No, Socket=No, Status=None
J11: library part SWITCHCRAFT_712RA, "2.5 mm Center Pin, 5A, 48V, Right Angle, Through Hole, , DC Power Jack Connector", Manufacturer=SWITCHCRAFT, Manufacturer Part Number=712RA, Author="CERN DEM JLC", Component Type=Standard, ComponentHeight=13.8mm, CreateDate=2017-12-19, Family=Jack, HelpURL=\\cern.ch\dfs\Applications\Altium\Datasheets\SWITCHCRAFT_712RA.pdf, LatestRevisionDate=2017-12-19, Mounted=Yes, Part Description="2.5 mm Center Pin, 5A, 48VDC, Right Angle, Through Hole, Locking Power Jack Connector (Threaded Bushings)", Part Number=SWITCHCRAFT_712RA, Pin Count=3, PressFit=No, Sense=No, SMD=No, Socket=No, Status=None
L1 L2 L3 L4 L5 L9 L11 L12 L14 L15 L16 L18 L20 L22 L23 L28 L29: library part IND0603_MURATA_BLM18SG121TN1D, Case=0603, Manufacturer=MURATA, Manufacturer Part Number=BLM18SG121TN1D, Power=3A, Resistance=0.025R, Tolerance=±25%, Author="CERN DEM JLC", Component Type=Standard, ComponentHeight=0.65mm, CreateDate=23.07.2014, HelpURL=\\cern.ch\dfs\Applications\Altium\Datasheets\IND0603_MURATA_BLM18S.pdf, LatestRevisionDate=25.10.2018, Mounted=Yes, Part Description="SMD EMIFIL Suppression Chip Ferrite Bead", Part Number=IND0603_MURATA_BLM18SG121TN1D, Pin Count=2, Sense=No, SMD=Yes, Socket=No, Status=None
L6 L7: library part IND0805_MURATA_BLM21PG221SN1D, "Inductor", Case=0805, Manufacturer=MURATA, Manufacturer Part Number=BLM21PG221SN1D, Power=2A, Resistance=0.05R, Tolerance=±25%, Author="CERN DEM JLC", Component Type=Standard, ComponentHeight=1.05mm, CreateDate=25/01/2010, HelpURL=\\cern.ch\dfs\Applications\Altium\Datasheets\IND0805_MURATA_BLM21P.pdf, LatestRevisionDate=25/01/2010, Mounted=Yes, Part Description="SMD EMIFIL Suppression Chip Ferrite Bead", Part Number=IND0805_MURATA_BLM21PG221SN1D, Pin Count=2, Sense=No, SMD=Yes, Socket=No, Status=None
L8: library part CMP-03913-148605651-1, "Power Inductor, 0.9UH, Shielded, 14A Rohs Compliant: Yes"
L10 L13 L24 L25: library part IND2525_4.7UH_20%_VISHAY_IHLP-2525CZ-01, "Inductor With Core", Case=2525, Manufacturer="VISHAY DALE", Manufacturer Part Number=IHLP2525CZER4R7M01, Power=5.5A, Resistance=0.037R, Tolerance=±20%, Author="CERN DEM MR", Component Type=Standard, ComponentHeight=3mm, HelpURL=\\cern.ch\dfs\Applications\Altium\Datasheets\IND2525_VISHAY_IHLP-2525CZ-01.pdf, Mounted=Yes, Part Description="Low Profile, High Current IHLP® Inductor", Part Number=IND2525_4.7UH_20%_VISHAY_IHLP-2525CZ-01, Pin Count=2, Sense=No, SMD=Yes, Socket=No, Status=None
  L10 L13: CreateDate=29.06.2017, LatestRevisionDate=29.06.2017
  L24 L25: CreateDate=2017-06-29, LatestRevisionDate=2017-06-29
L19: library part IND_6.8UH_20%_COILCRAFT_XAL4030, "Inductor With Core", Manufacturer=COILCRAFT, Manufacturer Part Number=XAL4030-682MEB, Power=3A, Resistance=0.0741R, Tolerance=±20%, Author="CERN DEM MR", Component Type=Standard, ComponentHeight=2.1mm, CreateDate=14.03.2016, HelpURL=\\cern.ch\dfs\Applications\Altium\Datasheets\IND_COILCRAFT_XAL4030.pdf, LatestRevisionDate=14.03.2016, Mounted=Yes, Part Description="SMD Shielded Power Inductor", Part Number=IND_6.8UH_20%_COILCRAFT_XAL4030, Pin Count=2, Sense=No, SMD=Yes, Socket=No, Status=None
L21: library part IND2020_3.3UH_20%_VISHAY_IHLP-2020BZ-11, "Inductor With Core", Case=2020, Manufacturer="VISHAY DALE", Manufacturer Part Number=IHLP2020BZER3R3M11, Power=4.1A, Resistance=0.0578R, Tolerance=±20%, Author="CERN DEM MR", Component Type=Standard, ComponentHeight=2mm, CreateDate=04.12.2017, HelpURL=\\cern.ch\dfs\Applications\Altium\Datasheets\IND2020_VISHAY_IHLP2020BZ-11.pdf, LatestRevisionDate=04.12.2017, Mounted=Yes, Part Description="Low Profile, High Current IHLP® Inductor", Part Number=IND2020_3.3UH_20%_VISHAY_IHLP-2020BZ-11, Pin Count=2, Sense=No, SMD=Yes, Socket=No, Status=None
L26: library part IND_33UH_30%_WURTH_WE-TPC_744043330, "Inductor With Core", Manufacturer="WURTH ELEKTRONIK", Manufacturer Part Number=744043330, Power=820mA, Resistance=0.23R, Tolerance=±30%, Author="CERN DEM JLC", Component Type=Standard, ComponentHeight=3mm, CreateDate=2014-11-24, HelpURL=\\cern.ch\dfs\Applications\Altium\Datasheets\IND_WURTH_WE-TPC_744043330.pdf, LatestRevisionDate=2014-11-24, Mounted=Yes, Part Description="Shielded Tiny Power Inductor (WE-TPC Series)", Part Number=IND_33UH_30%_WURTH_WE-TPC_744043330, Pin Count=2, Sense=No, SMD=Yes, Socket=No, Status=None
L27: library part IND_10UH_20%_TDK_VLCF5020-1, "Inductor With Core", Manufacturer=TDK, Manufacturer Part Number=VLCF5020T-100M1R1-1, Power=1.5A, Resistance=0.198R, Tolerance=±20%, Author="CERN DEM JLC", Component Type=Standard, ComponentHeight=2mm, CreateDate=2014-07-10, HelpURL=\\cern.ch\dfs\Applications\Altium\Datasheets\IND_TDK_VLCF.pdf, LatestRevisionDate=2014-07-10, Mounted=Yes, Part Description="SMD Inductor for Power Circuits (Wound/STD , Magnetic Shielded), VLCF series", Part Number=IND_10UH_20%_TDK_VLCF5020-1, Pin Count=2, Sense=No, SMD=Yes, Socket=No, Status=None
LD1 LD3 LD4 LD5 LD6 LD7 LD8 LD9 LD10 LD12 LD14: library part LED_KINGBRIGHT_KPH-1608CGCK, "LED Green 1C 2A", Manufacturer=KINGBRIGHT, Manufacturer Part Number=KPH-1608CGCK, Author="CERN DEM JLC", Bonding=No, Color=Green, Component Type=Standard, ComponentHeight=0.65mm, CreateDate=03.07.2017, HelpURL=\\cern.ch\dfs\Applications\Altium\Datasheets\LED_KINGBRIGHT_KPH-1608CGCK.pdf, LatestRevisionDate=03.07.2017, Mounted=Yes, PackageDescription="SMT Green LED, Case 0603, Body L 1.6 x W 0.8mm H 0.65mm", Part Description="SMD Green LED, Case 1.6mmX0.8mm(0603), 0.65mm Thickness", Part Number=LED_KINGBRIGHT_KPH-1608CGCK, Pin Count=2, PressFit=No, Sense=No, SMD=Yes, Socket=No
LD2 LD13 LD18: library part LED_AVAGO_HSME-C120, "LED Green 1C 2A", Manufacturer="AVAGO TECHNOLOGIES", Manufacturer Part Number=HSME-C120, Author="CERN DEM JMW", Bonding=No, Color=Green, Component Type=Standard, ComponentHeight=0.7mm, ComponentLink1Description="Design Guide", ComponentLink1URL=\\cern.ch\dfs\Applications\Altium\Datasheets\LED_AVAGO_HSME-C110_DESIGN-GUIDE.pdf, CreateDate=22.07.2009, HelpURL=\\cern.ch\dfs\Applications\Altium\Datasheets\LED_AVAGO_HSME-C120.pdf, LatestRevisionDate=20.06.2012, Mounted=Yes, PackageDescription="Green Chip LED, 2-Leads, Body 1.7x1.1mm, Side Emitting Package", Part Description="High Performance Right Angle Chip Green LED", Part Number=LED_AVAGO_HSME-C120, Pin Count=2, PressFit=No, Sense=No, SMD=Yes, Socket=No
LD11: library part LED_DIALIGHT_571-0112F, "2x LED  Botom Green, Top Red", Manufacturer=DIALIGHT, Manufacturer Part Number=571-0112F, Author="CERN DEM JLC", Bonding=No, Color=Red/Green, Component Type=Standard, ComponentHeight=8.6mm, CreateDate=09.11.2009, HelpURL=\\cern.ch\dfs\Applications\Altium\Datasheets\LED_DIALIGHT_571-0112F.pdf, LatestRevisionDate=17.03.2010, Mounted=Yes, PackageDescription="2x 2mm LED (Top: Red, Bot: Green) PCB Edge Mounting (Without positioning pins) DIALIGHT 571 Serie", Part Description="Dual 2mm  LEDs, Red Top,Green Bot, CBI® Circuit Board Indicator (Without positioning pins)", Part Number=LED_DIALIGHT_571-0112F, Pin Count=4, PressFit=No, Sense=No, SMD=No, Socket=No
LD15: library part LED_AVAGO_HSMC-C120, "LED Red 1C 2A", Manufacturer="AVAGO TECHNOLOGIES", Manufacturer Part Number=HSMC-C120, Author="CERN DEM JMW", Bonding=No, Color=Red, Component Type=Standard, ComponentHeight=0.7mm, ComponentLink1Description="Design Guide", ComponentLink1URL=\\cern.ch\dfs\Applications\Altium\Datasheets\LED_AVAGO_HSMC-C120_DESIGN-GUIDE.pdf, CreateDate=22.07.2009, HelpURL=\\cern.ch\dfs\Applications\Altium\Datasheets\LED_AVAGO_HSMC-C120.pdf, LatestRevisionDate=20.06.2012, Mounted=Yes, PackageDescription="Red Chip LED, 2-Leads, Body 1.7x1.1mm, Side Emitting Package", Part Description="High Performance Right Angle Chip Red LED", Part Number=LED_AVAGO_HSMC-C120, Pin Count=2, PressFit=No, Sense=No, SMD=Yes, Socket=No
M1 M2 M3 M4: library part PLATED_HOLE3.0_PAD6.0, "Single Terminal Socket", Author="CERN DEM JLC", Component Type="Standard (No BOM)", ComponentHeight=0mm, CreateDate=26.05.2008, Family="Plated Hole", LatestRevisionDate=26.05.2008, Mounted=No, PackageDescription="Plated Through Hole: Hole Dia.=3.0mm Pad Dia.=6.0mm", Part Description="Plated Through Hole: Hole Dia.=3.0mm Pad Dia.=6.0mm", Part Number=PLATED_HOLE3.0_PAD6.0, Pin Count=1, SMD=No, Socket=No, Status=None, Table=Pads
M5 M6 M7 M8: library part CMP-00028-00019-2, "PTH  Hole 3.4, 6mm pad", Pins=1
OSC1: library part OSC_CRYSTEK_CCLD-033, "3.3V, ± 50ppm, 0°C to +70°C, Surface Mount LVDS Clock Oscillator (CCLD-033 Series)", Manufacturer="CRYSTEK CRYSTAL", Manufacturer Part Number=CCLD-033-50-125.000, Part Number=OSC_125MHZ_CRYSTEK_CCLD-033-50-125.000, Author="CERN DEM JLC", Bonding=No, Component Type=Standard, ComponentHeight=1.8mm, CreateDate=23.02.2017, HelpURL=\\cern.ch\dfs\Applications\Altium\Datasheets\OSC_CRYSTEK_CCLD-033.pdf, LatestRevisionDate=23.02.2017, Mounted=Yes, PackageDescription="Oscillator, Side Concave, 2.54mm Pitch, 6 Pins, 5.00mm L X 7.00mm W X 1.80mm H, CCLD-033 Series", Part Description="3.3V, ± 50ppm, 0°C to +70°C, Surface Mount LVDS Clock Oscillator (CCLD-033 Series)", Pin Count=6, PressFit=No, Sense=No, SMD=Yes, Socket=No
Plate1: library part AMPHENOL_U77A11108000P, "Plastic Dust Cover SFP Cage", Manufacturer=AMPHENOL, Manufacturer Part Number=U77A11108000P, Author="CERN DEM BC", Component Type=Standard, ComponentHeight=10.2mm, CreateDate=28.10.2019, HelpURL=\\cern.ch\dfs\Applications\Altium\Datasheets\AMPHENOL_U77A11108000P.pdf, LatestRevisionDate=28.10.2019, Mounted=Yes, PackageDescription="Plastic Dust Cover SFP Cage", Part Description="Plastic Dust Cover SFP Cage", Part Number=AMPHENOL_U77A11108000P, Pin Count=0, PressFit=No, Sense=No, SMD=No, Socket=No, Status=None
R1 R3 R13 R14 R20 R21 R38 R39 R40 R41 R77 R93 R96 R104 R105 R106 R107 R109 R110 R111 R112 R114 R143 R144 R145 R146 R147 R148 R149 R150 R151 R152 R153 R154 R155 R156 R157 R158 R159 R161 R162 R163 R164 R167 R168 R169 R170 R171 R172 R173 R174 R175 R176 R177 R188 R194 R263 R264 R266 R270 R271 R272 R276 R283: library part R0402_0R_JUMPER, "Resistor", Case=0402, Manufacturer=GENERIC, Manufacturer1 ComponentHeight=0.4mm, Manufacturer1 Example="YAGEO PHYCOMP", Manufacturer1 Part Number=232270591001L, Author="CERN DEM JLC", Component Type=Standard, CreateDate=03.12.2007, HelpURL=\\cern.ch\dfs\Applications\Altium\Datasheets\R0402_Phycomp_RC0402.pdf, LatestRevisionDate=17.10.2012, Manufacturer Part Number=R0402_0R_JUMPER, Mounted=Yes, Part Description="1A (0.05R Max DC Resistance) Zero Ohm Jumper", Part Number=R0402_0R_JUMPER, Pin Count=2, Sense=No, SMD=Yes, Socket=No
  R1 R3 R13 R14 R20 R21 R38 R39 R40 R41 R77 R93 R96 R104 R105 R106 R107 R109 R110 R111 R112 R114 R143 R144 R145 R146 R147 R148 R149 R150 R151 R152 R153 R154 R155 R156 R157 R158 R159 R161 R162 R163 R164 R167 R168 R169 R170 R171 R172 R173 R174 R175 R176 R177 R264 R266 R270 R271 R272 R276 R283: PressFit=No, Status="Not Recommended"
  R188 R194 R263: Status="Not recommended"
R2 R4 R6 R8 R10 R83 R84 R127 R128 R141 R142 R245 R246: library part R0201_0R_JUMPER, "Resistor", Case=0201, Manufacturer=GENERIC, Manufacturer1 ComponentHeight=0.27mm, Manufacturer1 Example=VISHAY, Manufacturer1 Part Number=CRCW02010000Z0ED, Author="CERN DEM JLC", Component Type=Standard, HelpURL="\\cern.ch\dfs\Applications\Altium\Datasheets\R0201_VISHAY_CRCW e3.pdf", Manufacturer Part Number=R0201_0R_JUMPER, Mounted=Yes, Part Description="1A (0.05R Max DC Resistance) Zero Ohm Jumper", Part Number=R0201_0R_JUMPER, Pin Count=2, PressFit=No, Sense=No, SMD=Yes, Socket=No, Status="Not Recommended"
  R2 R4 R6 R8 R10 R127 R128 R141 R142 R245 R246: CreateDate=2014-11-19, LatestRevisionDate=2015-01-08
  R83 R84: CreateDate=19.11.2014, LatestRevisionDate=08.01.2015
R5 R7 R9 R11 R15 R16 R129 R275: library part R0402_200R_1%_0.0625W_100PPM, "Resistor - 1%", Case=0402, Manufacturer=GENERIC, Manufacturer1 ComponentHeight=0.4mm, Manufacturer1 Example="YAGEO PHYCOMP", Manufacturer1 Part Number=232270672001L, Power=0.0625W, Tolerance=±1%, Author="CERN DEM JLC", Component Type=Standard, HelpURL=\\cern.ch\dfs\Applications\Altium\Datasheets\R0402_Phycomp_RC0402.pdf, Manufacturer Part Number=R0402_200R_1%_0.0625W_100PPM, Mounted=Yes, Part Description="General Purpose Thick Film Chip Resistor", Part Number=R0402_200R_1%_0.0625W_100PPM, Pin Count=2, PressFit=No, Sense=No, SMD=Yes, Socket=No, Status="Not Recommended", TC=±100ppm/°C
  R5 R7 R9 R11 R15 R16 R275: CreateDate=03.12.2007, LatestRevisionDate=17.10.2012
  R129: CreateDate=2007-12-03, LatestRevisionDate=2012-10-17
R12 R42 R43 R46 R47 R48 R49 R50 R51 R52 R53 R54 R55 R56 R57 R58 R59 R60 R61 R62 R63 R64 R65 R69 R247 R248: library part R0402_49R9_1%_0.0625W_100PPM, "Resistor - 1%", Case=0402, Manufacturer=GENERIC, Manufacturer1 ComponentHeight=0.4mm, Manufacturer1 Example="YAGEO PHYCOMP", Manufacturer1 Part Number="232270674999L or RC0402FR-0749R9L", Power=0.0625W, Tolerance=±1%, Author="CERN DEM JLC", Component Type=Standard, CreateDate=24.10.2012, HelpURL=\\cern.ch\dfs\Applications\Altium\Datasheets\R0402_Phycomp_RC0402.pdf, LatestRevisionDate=24.10.2012, Manufacturer Part Number=R0402_49R9_1%_0.0625W_100PPM, Mounted=Yes, Part Description="General Purpose Thick Film Chip Resistor", Part Number=R0402_49R9_1%_0.0625W_100PPM, Pin Count=2, PressFit=No, Sense=No, SMD=Yes, Socket=No, Status="Not Recommended", TC=±100ppm/°C
R17 R18 R19 R22 R27 R28 R29 R30 R31 R32 R33 R34 R37 R70 R71 R72 R73 R74 R75 R85 R86 R87 R92 R94 R97 R102 R103 R108 R113 R115 R116 R118 R121 R122 R123 R165 R166 R179 R180 R187 R191 R193 R195 R196 R213 R215 R221 R224 R235 R236 R237 R238 R249 R250 R251 R252 R253 R256 R278 R284 R285 R286 R288: library part R0402_10K_1%_0.0625W_100PPM, "Resistor - 1%", Case=0402, Manufacturer=GENERIC, Manufacturer1 ComponentHeight=0.4mm, Manufacturer1 Example="YAGEO PHYCOMP", Manufacturer1 Part Number=232270671003L, Power=0.0625W, Tolerance=±1%, Author="CERN DEM JLC", Component Type=Standard, HelpURL=\\cern.ch\dfs\Applications\Altium\Datasheets\R0402_Phycomp_RC0402.pdf, Manufacturer Part Number=R0402_10K_1%_0.0625W_100PPM, Mounted=Yes, Part Description="General Purpose Thick Film Chip Resistor", Part Number=R0402_10K_1%_0.0625W_100PPM, Pin Count=2, SMD=Yes, Socket=No, TC=±100ppm/°C
  R17 R18 R22 R85 R86 R87 R92 R94 R102 R103 R118 R191 R215 R221 R235 R251 R252 R253 R256 R284: CreateDate=2007-12-03, LatestRevisionDate=2012-10-17, PressFit=No, Sense=No, Status="Not Recommended"
  R19 R27 R28 R29 R30 R31 R32 R33 R34 R37 R70 R71 R72 R73 R74 R75 R97 R121 R122 R123 R165 R166 R179 R180 R187 R193 R195 R196 R213 R224 R236 R237 R238 R249 R250 R278 R285 R286 R288: CreateDate=03.12.2007, LatestRevisionDate=17.10.2012, PressFit=No, Sense=No, Status="Not Recommended"
  R108 R113 R115 R116: CreateDate=2007-12-03, LatestRevisionDate=2012-10-17, Status="Not recommended", Table="Resistors SMD"
R23 R35 R36 R76 R79 R80 R81 R82 R95 R117 R160 R181 R182 R183 R207 R225 R254 R273: library part R0402_1K_1%_0.0625W_100PPM, "Resistor - 1%", Case=0402, Manufacturer=GENERIC, Manufacturer1 ComponentHeight=0.4mm, Manufacturer1 Example="YAGEO PHYCOMP", Manufacturer1 Part Number=232270671002L, Power=0.0625W, Tolerance=±1%, Author="CERN DEM JLC", Component Type=Standard, HelpURL=\\cern.ch\dfs\Applications\Altium\Datasheets\R0402_Phycomp_RC0402.pdf, Manufacturer Part Number=R0402_1K_1%_0.0625W_100PPM, Mounted=Yes, Part Description="General Purpose Thick Film Chip Resistor", Part Number=R0402_1K_1%_0.0625W_100PPM, Pin Count=2, PressFit=No, Sense=No, SMD=Yes, Socket=No, Status="Not Recommended", TC=±100ppm/°C
  R23 R95 R117 R181 R182 R183 R254 R273: CreateDate=2007-12-03, LatestRevisionDate=2012-10-17
  R35 R36 R76 R81 R82: ClassName=Artix, CreateDate=03.12.2007, LatestRevisionDate=17.10.2012
  R79 R80 R160 R207 R225: CreateDate=03.12.2007, LatestRevisionDate=17.10.2012
R24 R25 R26: library part R0201_100R_1%_0.05W_200PPM, "Resistor - 1%", Case=0201, Manufacturer=GENERIC, Manufacturer1 ComponentHeight=0.27mm, Manufacturer1 Example=VISHAY, Manufacturer1 Part Number=CRCW0201100RFNED, Power=0.05W, Tolerance=±1%, Author="CERN DEM JLC", Component Type=Standard, HelpURL="\\cern.ch\dfs\Applications\Altium\Datasheets\R0201_VISHAY_CRCW e3.pdf", Manufacturer Part Number=R0201_100R_1%_0.05W_200PPM, Mounted=Yes, Part Description="Thick Film Chip Resistor", Part Number=R0201_100R_1%_0.05W_200PPM, Pin Count=2, PressFit=No, Sense=No, SMD=Yes, Socket=No, Status="Not Recommended", TC=±200ppm/°C
  R24 R25: CreateDate=2014-11-13, LatestRevisionDate=2014-11-13
  R26: CreateDate=13.11.2014, LatestRevisionDate=13.11.2014
R44 R67 R68 R178 R226 R233 R287: library part R0402_240R_1%_0.0625W_100PPM, "Resistor - 1%", Case=0402, Manufacturer=GENERIC, Manufacturer1 ComponentHeight=0.4mm, Manufacturer1 Example="YAGEO PHYCOMP", Manufacturer1 Part Number=232270672401L, Power=0.0625W, Tolerance=±1%, Author="CERN DEM JLC", Component Type=Standard, HelpURL=\\cern.ch\dfs\Applications\Altium\Datasheets\R0402_Phycomp_RC0402.pdf, Manufacturer Part Number=R0402_240R_1%_0.0625W_100PPM, Mounted=Yes, Part Description="General Purpose Thick Film Chip Resistor", Part Number=R0402_240R_1%_0.0625W_100PPM, Pin Count=2, PressFit=No, Sense=No, SMD=Yes, Socket=No, Status="Not Recommended", TC=±100ppm/°C
  R44 R67 R68 R178 R226 R287: CreateDate=03.12.2007, LatestRevisionDate=17.10.2012
  R233: CreateDate=2007-12-03, LatestRevisionDate=2012-10-17
R45 R98 R99 R100 R227 R255: library part R0402_2K2_1%_0.0625W_100PPM, "Resistor - 1%", Case=0402, Manufacturer=GENERIC, Manufacturer1 ComponentHeight=0.4mm, Manufacturer1 Example="YAGEO PHYCOMP", Manufacturer1 Part Number=232270672202L, Power=0.0625W, Tolerance=±1%, Author="CERN DEM JLC", ClassName=Artix, Component Type=Standard, CreateDate=03.12.2007, HelpURL=\\cern.ch\dfs\Applications\Altium\Datasheets\R0402_Phycomp_RC0402.pdf, LatestRevisionDate=17.10.2012, Manufacturer Part Number=R0402_2K2_1%_0.0625W_100PPM, Mounted=Yes, Part Description="General Purpose Thick Film Chip Resistor", Part Number=R0402_2K2_1%_0.0625W_100PPM, Pin Count=2, PressFit=No, Sense=No, SMD=Yes, Socket=No, Status="Not Recommended", TC=±100ppm/°C